# Altium PCB MiniPC.PcbDoc (part 12 of 24)
Units mm, origin at the board's own origin, x right, y up, seen from the top; angles counter-clockwise.
Board outline 175 x 155 mm, 16 copper layers (1_Top, 2_int1_(gnd), 3_int2_(power), 4_int3_(gnd), 5_int4_(sign), 6_int5_(power), 7_int6_(sign), 8_int7_(power), 9_int8_(gnd), 10_int9_(sign), 11_int10_(gnd), 12_int11_(sign), 13_int12_(gnd), 14_int13_(power), 15_int14_(gnd), 16_Bottom), stack 2.008 mm thick; 1046 components, 837 nets, 6010 pads, 4009 vias.
Unrouted connection lines stored in the file: 564.
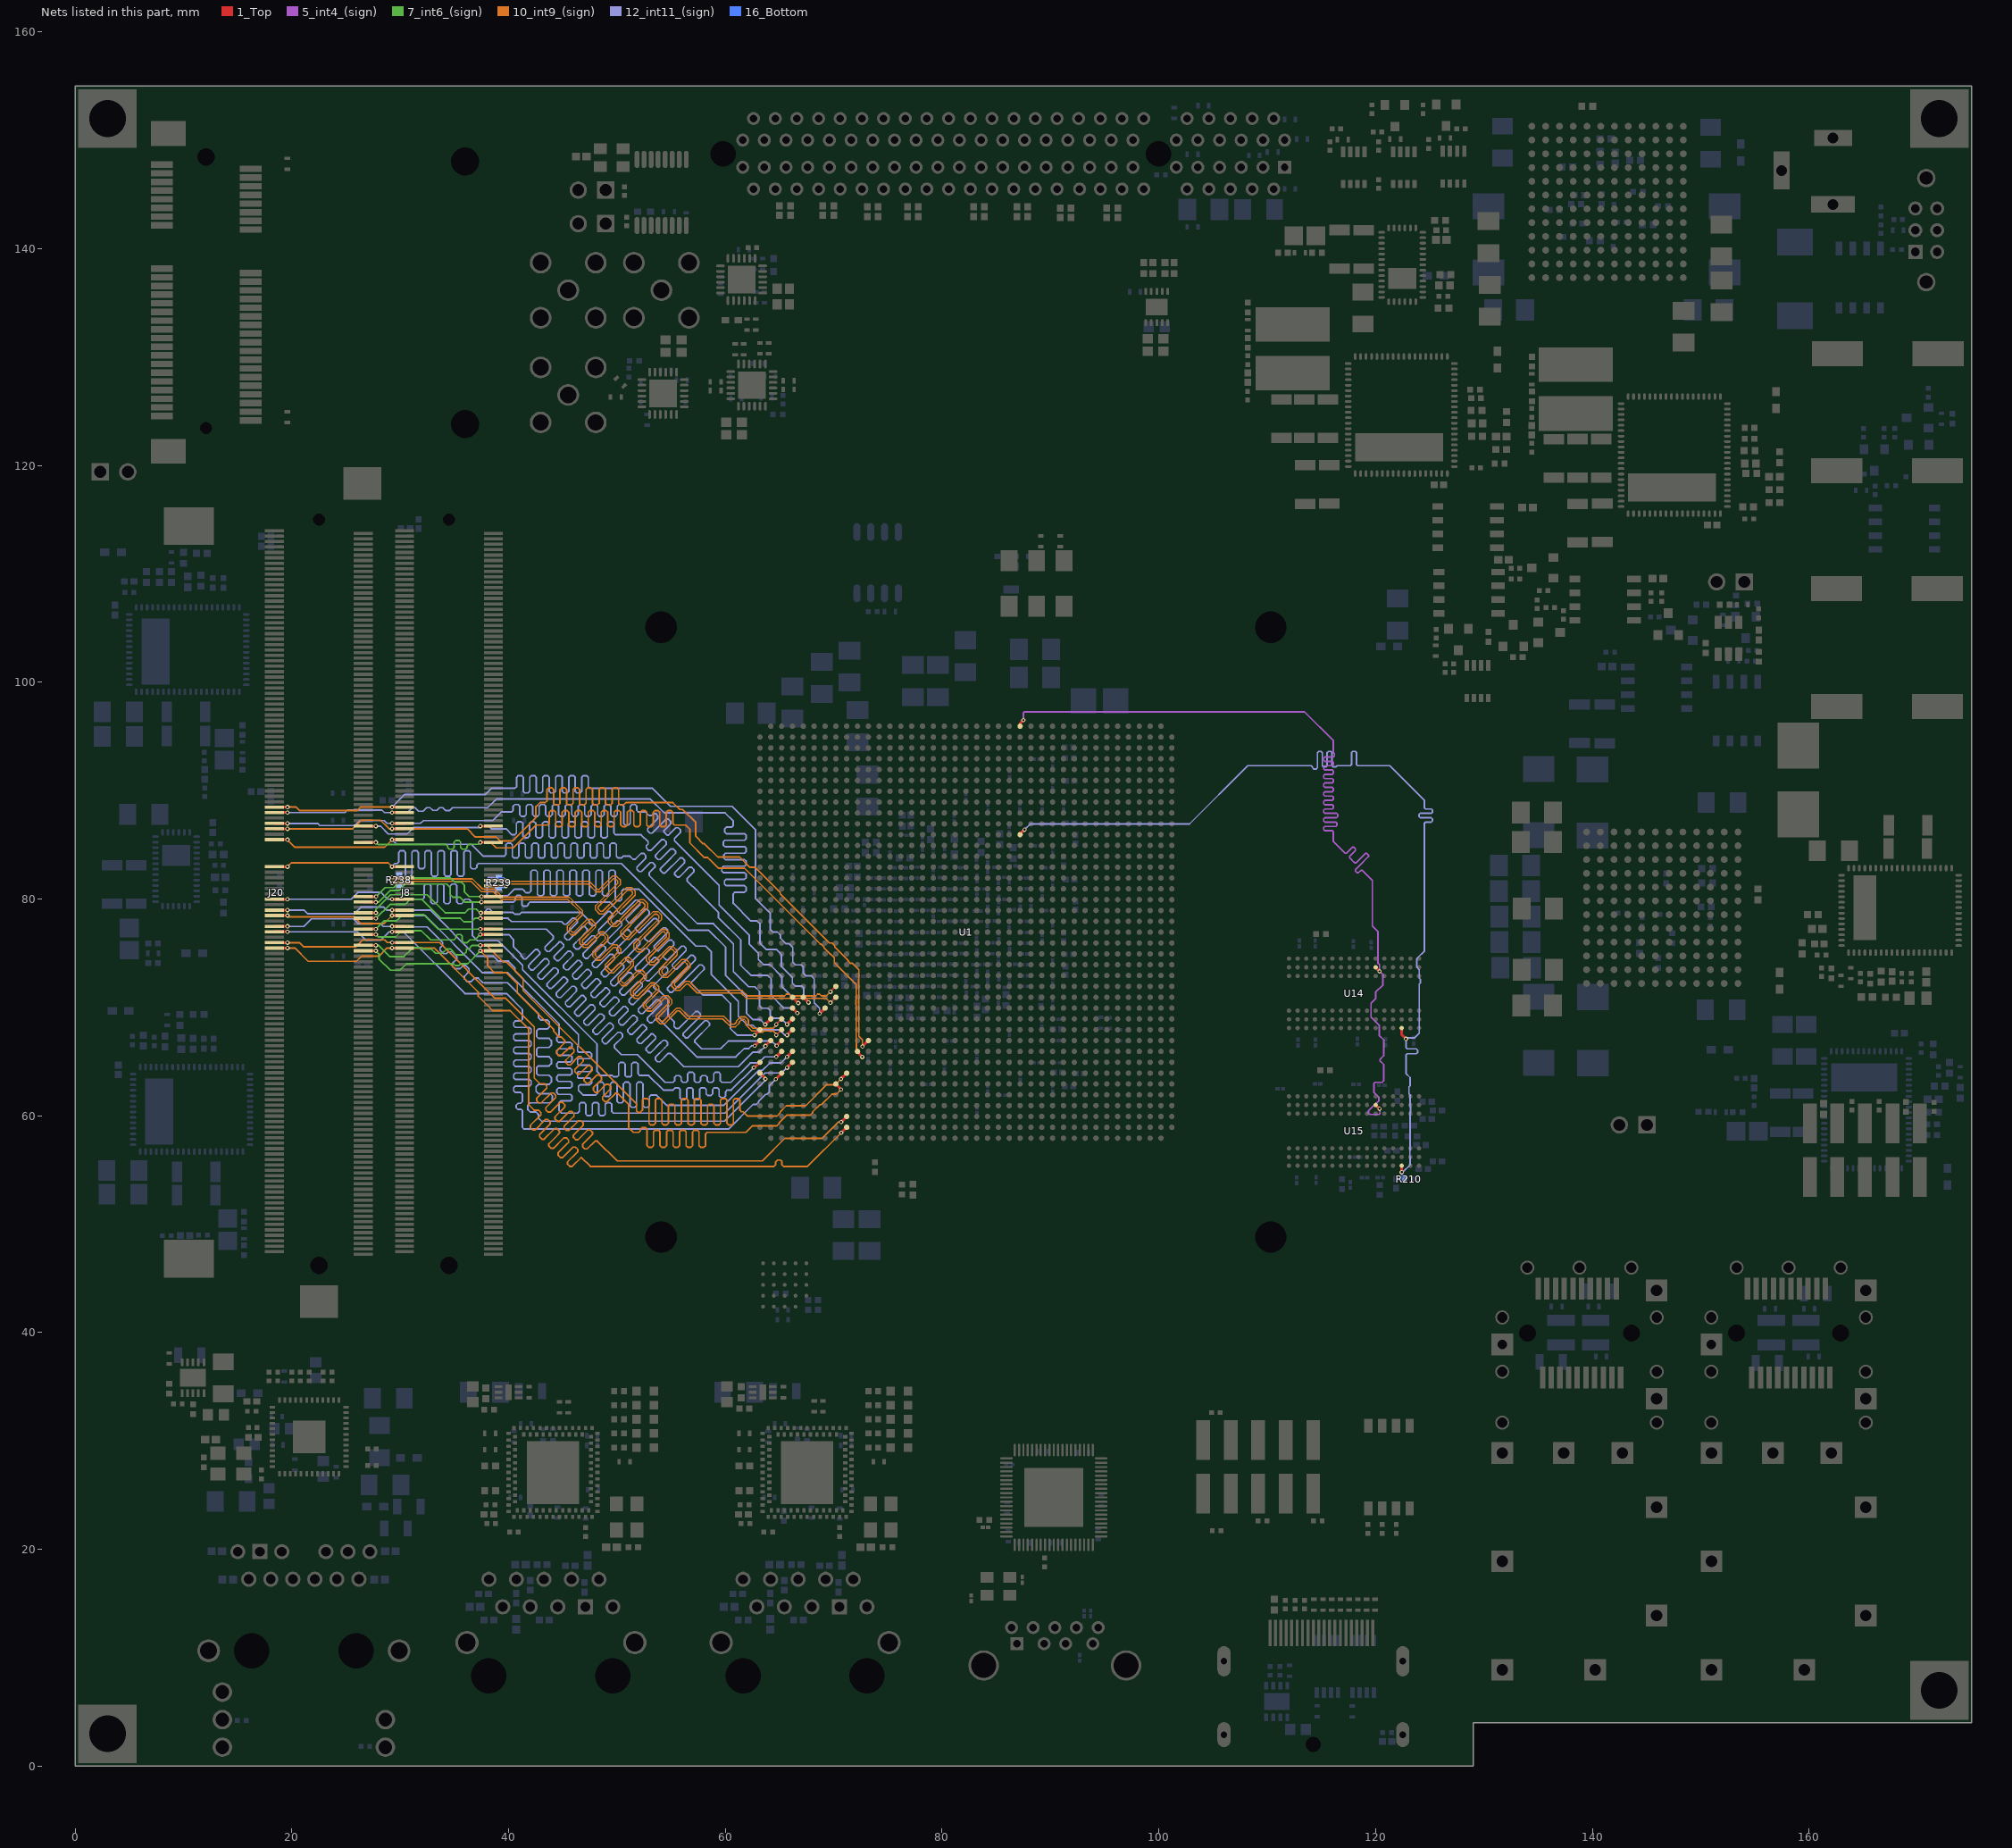
[diagram p24: the nets of this part, all layers, seen from the top]

## Via types
v1: diameter 0.4, hole 0.2, 1_Top to 16_Bottom, tented both sides, 1658 vias
v2: diameter 0.5, hole 0.2, 1_Top to 16_Bottom, tented both sides, 1014 vias
v3: diameter 0.7, hole 0.3, 1_Top to 16_Bottom, tented both sides, 915 vias
v4: diameter 0.6, hole 0.2, 1_Top to 16_Bottom, tented both sides, 278 vias
v5: diameter 0.4, hole 0.2, 1_Top to 16_Bottom, 93 vias
v6: diameter 0.4/0/0/0/0/0/0/0/0/0/0/0/0/0/0/0.4 (per signal layer), hole 0.2, 1_Top to 16_Bottom, tented both sides, 18 vias
v7: diameter 0.4/0/0/0/0/0/0/0/0/0/0/0.4/0.4/0.4/0.4/0.4 (per signal layer), hole 0.2, 1_Top to 16_Bottom, tented both sides, 16 vias
v8: diameter 0.5, hole 0.254, 1_Top to 16_Bottom, tented both sides, 15 vias
v9: diameter 0.5, hole 0.2, 1_Top to 16_Bottom, 2 vias

## Nets (pads, with @x,y where several pads share a name; then routed paths per layer and width w, separated by ;. In a path a pad name is that pad's centre, name@x,y a point inside that pad or via, vN(x,y) a via of type N, cw(c..) or ccw(c..) an arc to the next point about the centre after c; other vN are vias at no path point) (continued)
DDR4_RAS: U1.A25 U14.L8 U15.L8 | length 93.3
  1_Top w0.25: U1.A25@87.194,95.939 87.194,96.194 v1(87.5,96.5) ; U15.L8@120,61 v1(120.35,60.65) ; U14.L8@120,73.7 120.35,73.35 v1(120.35,73.328)
  5_int4_(sign) w0.15: v1(87.5,96.5) 87.5,97.179 87.581,97.26 113.44,97.26 116.1,94.6 116.1,93.811 116.1,93.7 116.1,93.5 116.192,93.408 116.192,93.192 116.1,93.1 115.31,93.1 115.21,93 115.21,92.8 115.31,92.7 116,92.7 116.1,92.6 116.1,92.4 116,92.3 115.31,92.3 115.21,92.2 115.21,92 115.31,91.9 116,91.9 116.1,91.8 116.1,91.6 116,91.5 115.31,91.5 115.21,91.4 115.21,91.2 115.31,91.1 116,91.1 116.1,91 116.1,90.8 116,90.7 115.31,90.7 115.21,90.6 115.21,90.4 115.31,90.3 116,90.3 116.1,90.2 116.1,90 116,89.9 115.31,89.9 115.21,89.8 115.21,89.6 115.31,89.5 116,89.5 116.1,89.4 116.1,89.2 116,89.1 115.31,89.1 115.21,89 115.21,88.8 115.31,88.7 116,88.7 116.1,88.6 116.1,88.4 116,88.3 115.31,88.3 115.21,88.2 115.21,88 115.31,87.9 116.1,87.9 116.4,87.9 116.5,87.8 116.5,87.6 116.4,87.5 116.1,87.5 115.31,87.5 115.21,87.4 115.21,87.2 115.31,87.1 116.1,87.1 116.327,87.1 116.427,87 116.427,86.8 116.327,86.7 116.1,86.7 115.31,86.7 115.21,86.6 115.21,86.4 115.31,86.3 116,86.3 116.1,86.2 116.1,86.1 116.1,85.3 117.1,84.3 117.171,84.229 117.312,84.229 117.853,84.77 117.994,84.77 118.136,84.629 118.136,84.487 117.595,83.946 117.595,83.805 117.7,83.7 117.988,83.413 118.058,83.342 118.2,83.342 119.054,84.196 119.195,84.196 119.337,84.054 119.337,83.913 118.412,82.988 118.137,82.713 118.137,82.572 118.278,82.431 118.42,82.431 118.652,82.663 118.737,82.663 119.7,81.7 119.7,77.5 120.2,77 120.2,74.1 120.35,73.95 v1(120.35,73.328) 120.371,73.328 120.67,73.029 120.67,72.07 120,71.4 120,70.801 119.824,70.625 119.575,70.376 119.575,69.104 120.325,68.354 120.325,67.424 120.745,67.004 120.745,65.545 120.4,65.2 120.4,65.067 120.745,64.722 120.745,63.245 120.591,63.091 119.939,63.091 119.83,62.983 119.83,62.169 120.3,61.699 120.3,61.4 119.34,60.44 119.34,60.26 119.475,60.125 120.325,60.125 120.4,60.2 120.4,60.6 v1(120.35,60.65) 120.372,60.65 v1@120.4,60.679
DDR4_RESETN: R210.1 U1.L25 U14.P1 U15.P1 | length 93.4
  1_Top w0.25: U1.L25@87.194,85.939 87.194,85.994 v1(87.6,86.4) ; v1(122.4,54.8) U15.P1@122.4,55.4 ; U14.P1@122.4,68.1 122.4,67.5 v1(122.8,67.1)
  12_int11_(sign) w0.15: v1(87.6,86.4) 88.125,86.925 102.825,86.925 108.2,92.3 113.5,92.3 113.725,92.3 114.062,92.3 114.175,92.188 114.175,92.112 114.287,92 114.512,92 114.625,92.112 114.625,92.3 114.625,93.506 114.737,93.619 114.962,93.619 115.075,93.506 115.075,92.3 115.185,92.19 115.415,92.19 115.525,92.3 115.525,93.506 115.637,93.619 115.862,93.619 115.975,93.506 115.975,92.3 116.085,92.19 116.315,92.19 116.425,92.3 116.875,92.3 117.1,92.3 117.325,92.3 117.662,92.3 117.775,92.412 117.775,93.506 117.887,93.619 118.112,93.619 118.225,93.506 118.225,92.412 118.337,92.3 118.5,92.3 121.3,92.3 124.5,89.1 124.5,88.5 124.5,88.4 124.6,88.3 125.135,88.3 125.235,88.2 125.235,88 125.135,87.9 124.5,87.9 124.1,87.9 124,87.8 124,87.6 124.1,87.5 124.5,87.5 125.135,87.5 125.235,87.4 125.235,87.2 125.135,87.1 124.6,87.1 124.5,87 124.5,86.275 124.5,75.199 123.876,74.575 123.8,74.499 123.8,73.701 124.025,73.476 124.025,72.698 124.125,72.598 124.125,72.246 124.025,72.147 124.025,69.8 124.025,67.624 123.601,67.2 122.9,67.2 v1(122.8,67.1) 122.8,66.4 122.8,66.288 122.912,66.175 123.756,66.175 123.868,66.063 123.868,65.838 123.756,65.725 122.912,65.725 122.8,65.613 122.8,65.4 122.8,63.9 123.175,63.525 123.175,62.775 123.075,62.675 123.075,62.024 123.175,61.924 123.175,60.826 123.225,60.776 123.225,60.424 123.175,60.374 123.175,59.016 123.181,59.01 123.181,56.826 123.153,56.798 123.153,56.222 123.175,56.2 123.175,55.475 122.5,54.8 v1(122.4,54.8)
  16_Bottom w0.25: v1(122.4,54.8) 122.425,54.775 R210.1@122.425,54.175
DDR4_SODIMM_A0: J8.144 J20.144 U1.AH2 | length 79.6
  1_Top w0.25: J20.144@18.4,82.975 v1(19.602,82.975) ; v1(29.25,82.975) J8.144@30.4,82.975 ; v1(63.675,68.425) 63.68,68.425 U1.AH2@64.194,68.939
  10_int9_(sign) w0.15: v1(19.602,82.975) 19.977,83.35 28.875,83.35 v1(29.25,82.975)
  12_int11_(sign) w0.15: v1(29.25,82.975) 29.25,83.025 29.5,83.275 29.725,83.275 29.875,83.425 29.875,84.309 30.025,84.459 30.325,84.459 30.475,84.309 30.475,82.241 30.625,82.091 30.925,82.091 31.075,82.241 31.075,84.309 31.225,84.459 31.525,84.459 31.675,84.309 31.675,82.942 31.825,82.792 32.125,82.792 32.275,82.942 32.275,84.309 32.425,84.459 32.725,84.459 32.875,84.309 32.875,82.241 33.025,82.091 33.325,82.091 33.475,82.241 33.475,84.309 33.625,84.459 33.925,84.459 34.075,84.309 34.075,82.241 34.225,82.091 34.525,82.091 34.675,82.241 34.675,84.309 34.825,84.459 35.125,84.459 35.275,84.309 35.275,82.241 35.425,82.091 35.725,82.091 35.875,82.241 35.875,84.309 36.025,84.459 36.325,84.459 36.475,84.309 36.475,82.931 36.625,82.781 36.925,82.781 37.075,82.931 37.075,83.125 37.225,83.275 50.4,83.275 56.55,77.125 58.45,77.125 60.025,75.55 60.025,72.95 61.95,71.025 61.95,69.469 62.531,68.888 63.212,68.888 v1(63.675,68.425)
DDR4_SODIMM_A1: J8.133 J20.133 U1.AJ4 | length 85.5
  1_Top w0.25: J20.133@26.6,80.225 v1(27.775,80.225) ; v1(37.5,80.225) J8.133@38.6,80.225 ; v1(65.694,67.439) U1.AJ4@66.194,67.939
  7_int6_(sign) w0.15: v1(27.775,80.225) 28.6,81.05 29.4,81.05 30.275,81.925 34.65,81.925 35,81.575 35.6,81.575 35.925,81.25 35.925,80.65 36.35,80.225 v1(37.5,80.225)
  12_int11_(sign) w0.15: v1(37.5,80.225) 37.575,80.3 37.9,80.3 38.025,80.425 38.025,81.875 38.125,81.975 38.7,81.975 38.8,81.875 38.8,80.5 39,80.3 39.925,80.3 40.525,80.9 41.3,80.9 41.45,80.75 41.45,80.727 41.6,80.577 41.9,80.577 42.05,80.727 42.05,82.516 42.2,82.666 42.5,82.666 42.65,82.516 42.65,80.444 42.8,80.294 43.1,80.294 43.25,80.444 43.25,82.516 43.4,82.666 43.7,82.666 43.85,82.516 43.85,80.444 44,80.294 44.3,80.294 44.45,80.444 44.45,82.516 44.6,82.666 44.9,82.666 45.05,82.516 45.05,80.444 45.2,80.294 45.5,80.294 45.65,80.444 45.65,82.516 45.8,82.666 46.1,82.666 46.25,82.516 46.25,80.444 46.4,80.294 46.7,80.294 46.85,80.444 46.85,82.516 47,82.666 47.3,82.666 47.45,82.516 47.45,80.444 47.6,80.294 47.9,80.294 48.05,80.444 48.05,82.516 48.2,82.666 48.5,82.666 48.65,82.516 48.65,80.444 48.8,80.294 49.1,80.294 49.25,80.444 49.25,82.516 49.4,82.666 49.7,82.666 49.85,82.516 49.85,79.98 50,79.83 50.3,79.83 50.45,79.98 50.45,80.75 50.6,80.9 52.05,80.9 57.3,75.65 58.2,75.65 58.7,75.15 58.7,73.05 61.2,70.55 61.2,69.2 62.042,68.358 62.533,68.358 62.95,67.94 64.985,67.94 65.486,67.439 v1(65.694,67.439)
DDR4_SODIMM_A2: J8.132 J20.132 U1.AM1 | length 78.5
  1_Top w0.25: J20.132@18.4,79.975 v1(19.602,79.975) ; v1(29.25,79.975) J8.132@30.4,79.975 ; v1(62.625,64.45) 62.705,64.45 U1.AM1@63.194,64.939
  12_int11_(sign) w0.15: v1(19.602,79.975) 25.475,79.975 26.125,80.625 28.2,80.625 28.85,79.975 v1(29.25,79.975) 32.075,79.975 32.225,80.125 32.225,81.224 32.375,81.374 32.675,81.374 32.825,81.224 32.825,79.726 32.975,79.576 33.275,79.576 33.425,79.726 33.425,81.224 33.575,81.374 33.875,81.374 34.025,81.224 34.025,79.726 34.175,79.576 34.475,79.576 34.625,79.726 34.625,81.224 34.775,81.374 35.075,81.374 35.225,81.224 35.225,79.726 35.375,79.576 35.675,79.576 35.825,79.726 35.825,79.825 35.975,79.975 36.35,79.975 36.675,79.65 36.675,76.6 37.125,76.15 39.025,76.15 41.3,73.875 41.3,73.475 48.16,66.615 48.16,64.09 48.527,63.723 49.55,63.723 49.665,63.608 50.035,63.608 50.15,63.723 50.15,64.773 50.3,64.923 50.6,64.923 50.75,64.773 50.75,63.723 50.865,63.608 51.235,63.608 51.35,63.723 51.35,64.773 51.5,64.923 51.8,64.923 51.95,64.773 51.95,63.873 52.1,63.723 52.923,63.723 54.271,62.375 55.17,62.375 55.375,62.58 55.675,62.58 55.825,62.43 55.825,61.635 55.975,61.485 56.275,61.485 56.425,61.635 56.425,62.43 56.575,62.58 56.875,62.58 57.025,62.43 57.025,61.635 57.175,61.485 57.475,61.485 57.625,61.635 57.625,62.43 57.775,62.58 58.075,62.58 58.225,62.43 58.225,62.034 58.375,61.884 58.675,61.884 58.825,62.034 58.825,62.43 58.975,62.58 59.275,62.58 59.425,62.43 59.425,61.846 59.575,61.696 59.875,61.696 60.025,61.846 60.025,62.225 60.175,62.375 60.55,62.375 v1(62.625,64.45)
DDR4_SODIMM_A3: J8.131 J20.131 U1.AJ1 | length 80.8
  1_Top w0.25: J20.131@26.6,79.725 27.73,79.725 v1(27.751,79.704) ; v1(37.5,79.725) 38.592,79.725 38.596,79.729 J8.131@38.6,79.725 ; v1(62.694,67.439) U1.AJ1@63.194,67.939
  7_int6_(sign) w0.15: v1(27.751,79.704) 28.004,79.704 29.075,80.775 29.875,80.775 30.475,81.375 34.3,81.375 34.625,81.05 34.625,80.4 34.85,80.175 35.5,80.175 35.95,79.725 v1(37.5,79.725)
  12_int11_(sign) w0.15: v1(37.5,79.725) 40.475,79.725 40.625,79.875 40.625,80.172 40.775,80.322 41.075,80.322 41.225,80.172 41.225,79.483 41.375,79.333 41.675,79.333 41.825,79.483 41.825,79.575 41.975,79.725 49.325,79.725 50.011,79.039 50.011,78.915 50.312,78.614 50.436,78.614 51.714,79.893 51.926,79.893 52.138,79.681 52.138,79.468 50.86,78.19 50.86,78.067 51.161,77.766 51.284,77.766 52.563,79.044 52.775,79.044 52.987,78.832 52.987,78.62 51.708,77.342 51.708,77.218 52.009,76.917 52.133,76.917 53.411,78.196 53.623,78.196 53.835,77.984 53.835,77.771 52.557,76.493 52.557,76.37 52.858,76.069 52.981,76.069 54.26,77.347 54.472,77.347 54.684,77.135 54.684,76.923 53.405,75.644 53.405,75.521 53.706,75.22 53.83,75.22 54.823,76.214 55.035,76.214 55.247,76.002 55.247,75.789 54.254,74.796 54.254,74.673 54.555,74.372 54.678,74.372 55.957,75.65 56.169,75.65 56.381,75.438 56.381,75.226 55.103,73.947 55.103,73.824 55.404,73.523 55.527,73.523 56.805,74.802 57.017,74.802 57.229,74.589 57.229,74.377 54.673,71.821 54.673,71.608 54.885,71.396 55.097,71.396 56.375,72.675 57.621,73.921 57.833,73.921 58.046,73.709 58.046,73.496 56.825,72.276 56.825,72.225 57.9,71.15 59.675,71.15 60.475,70.35 60.475,68.05 61.086,67.439 v1(62.694,67.439)
DDR4_SODIMM_A4: J8.128 J20.128 U1.AL4 | length 83.1
  1_Top w0.25: J20.128@18.4,78.975 v1(19.602,78.975) ; v1(29.25,78.975) J8.128@30.4,78.975 ; v1(65.694,65.439) U1.AL4@66.194,65.939
  12_int11_(sign) w0.15: v1(19.602,78.975) 21.125,78.975 21.45,78.65 25.775,78.65 26.375,79.25 28.475,79.25 28.75,78.975 v1(29.25,78.975) 32.775,78.975 37.025,74.725 38.6,74.725 39.062,74.263 39.987,74.263 40.6,73.65 40.6,73.35 46.45,67.5 46.45,66.475 46.365,66.39 46.365,65.96 46.45,65.875 47.5,65.875 47.65,65.725 47.65,65.425 47.5,65.275 46.45,65.275 46.365,65.19 46.365,64.76 46.45,64.675 47.5,64.675 47.65,64.525 47.65,64.225 47.5,64.075 46.45,64.075 46.365,63.99 46.365,63.56 46.45,63.475 47.5,63.475 47.65,63.325 47.65,63.025 47.5,62.875 46.6,62.875 46.45,62.725 46.45,62.35 46.875,61.925 48.05,61.925 48.2,62.075 48.2,62.948 48.35,63.098 48.65,63.098 48.8,62.948 48.8,61.925 48.931,61.794 49.269,61.794 49.4,61.925 49.4,62.948 49.55,63.098 49.85,63.098 50,62.948 50,61.346 50.15,61.196 50.45,61.196 50.6,61.346 50.6,62.948 50.75,63.098 51.05,63.098 51.2,62.948 51.2,60.931 51.35,60.781 51.65,60.781 51.8,60.931 51.8,62.948 51.95,63.098 52.25,63.098 52.4,62.948 52.4,60.931 52.55,60.781 52.85,60.781 53,60.931 53,61.775 53.15,61.925 53.625,61.925 54.575,60.975 59.875,60.975 63.1,64.2 63.425,64.2 64.1,64.875 65.13,64.875 v1(65.694,65.439)
DDR4_SODIMM_A5: J8.126 J20.126 U1.AM4 | length 81.5
  1_Top w0.25: J20.126@18.4,78.475 v1(19.602,78.475) ; v1(29.25,78.475) J8.126@30.4,78.475 ; v1(65.694,64.439) U1.AM4@66.194,64.939
  10_int9_(sign) w0.15: v1(19.602,78.475) 19.727,78.35 25.775,78.35 26.4,77.725 28.5,77.725 v1(29.25,78.475)
  12_int11_(sign) w0.15: v1(29.25,78.475) 32.3,78.475 37.575,73.2 39.925,73.2 44.655,68.47 44.655,67.42 44.46,67.225 44.46,66.925 44.61,66.775 45.705,66.775 45.855,66.625 45.855,66.325 45.705,66.175 44.61,66.175 44.46,66.025 44.46,65.725 44.61,65.575 45.705,65.575 45.855,65.425 45.855,65.125 45.705,64.975 44.61,64.975 44.46,64.825 44.46,64.525 44.61,64.375 45.705,64.375 45.855,64.225 45.855,63.925 45.705,63.775 44.61,63.775 44.46,63.625 44.46,63.325 44.61,63.175 45.705,63.175 45.855,63.025 45.855,62.725 45.705,62.575 44.61,62.575 44.46,62.425 44.46,62.125 44.61,61.975 45.705,61.975 45.855,61.825 45.855,61.525 45.705,61.375 44.805,61.375 44.655,61.225 44.655,60.475 44.886,60.245 46.375,60.245 46.525,60.395 46.525,61.073 46.675,61.223 46.975,61.223 47.125,61.073 47.125,60.162 47.275,60.012 47.575,60.012 47.725,60.162 47.725,61.073 47.875,61.223 48.175,61.223 48.325,61.073 48.325,60.162 48.475,60.012 48.775,60.012 48.925,60.162 48.925,61.057 49.075,61.207 49.375,61.207 49.525,61.057 49.525,60.395 49.675,60.245 59.945,60.245 63.65,63.95 65.205,63.95 v1(65.694,64.439)
DDR4_SODIMM_A6: J8.127 J20.127 U1.AK3 | length 85.4
  1_Top w0.25: J20.127@26.6,78.725 v1(27.75,78.725) ; v1(37.436,78.725) J8.127@38.6,78.725 ; v1(64.725,66.47) U1.AK3@65.194,66.939
  7_int6_(sign) w0.15: v1(27.75,78.725) 27.75,79.05 29.1,80.4 32.479,80.4 34.154,78.725 35.975,78.725 36.325,79.075 37,79.075 37.35,78.725 v1(37.436,78.725)
  12_int11_(sign) w0.15: v1(37.436,78.725) 37.7,78.725 38.05,79.075 38.25,79.075 38.571,78.754 40.4,78.754 40.554,78.6 41.021,78.6 41.175,78.754 46.695,78.754 47.45,77.999 47.45,77.766 47.663,77.553 47.875,77.553 49.164,78.843 49.376,78.843 49.588,78.631 49.588,78.418 48.31,77.14 48.299,77.129 48.299,76.917 48.511,76.705 48.723,76.705 48.734,76.716 50.013,77.994 50.225,77.994 50.437,77.782 50.437,77.57 49.148,76.281 49.148,76.069 49.36,75.856 49.572,75.856 50.861,77.146 51.073,77.146 51.285,76.934 51.285,76.721 50.007,75.443 49.996,75.432 49.996,75.22 50.208,75.008 50.42,75.008 50.431,75.019 51.71,76.297 51.922,76.297 52.134,76.085 52.134,75.873 50.845,74.584 50.845,74.371 51.057,74.159 51.269,74.159 52.558,75.449 52.77,75.449 52.982,75.237 52.982,75.024 51.693,73.735 51.693,73.523 51.905,73.311 52.117,73.311 52.128,73.322 53.407,74.6 53.619,74.6 53.831,74.388 53.831,74.176 52.553,72.897 52.542,72.887 52.542,72.674 52.754,72.462 52.966,72.462 54.255,73.752 54.467,73.752 54.679,73.539 54.679,73.327 53.39,72.038 53.39,71.826 53.602,71.614 53.814,71.614 53.836,71.614 54.7,70.75 54.7,69.275 55.28,68.695 55.28,68.483 55.266,68.468 55.266,68.256 55.478,68.044 55.69,68.044 57.264,69.618 57.476,69.618 57.688,69.406 57.688,69.193 56.235,67.74 56.115,67.62 56.115,67.408 56.327,67.195 56.539,67.195 56.659,67.316 58.113,68.769 58.325,68.769 58.537,68.557 58.537,68.345 57.19,66.998 57.19,66.785 57.8,66.175 59.55,66.175 60.27,66.895 64.3,66.895 v1(64.725,66.47)
DDR4_SODIMM_A7: J8.122 J20.122 U1.AN1 | length 78.8
  1_Top w0.25: J20.122@18.4,77.475 v1(19.602,77.475) ; v1(29.25,77.475) J8.122@30.4,77.475 ; U1.AN1@63.194,63.939 63.7,63.433 v1(63.7,63.4)
  12_int11_(sign) w0.15: v1(19.602,77.475) 21.1,77.475 21.8,78.175 25.675,78.175 26.125,77.725 28.2,77.725 28.45,77.475 v1(29.25,77.475) 29.3,77.425 32.475,77.425 33.925,75.975 33.925,75.725 33.675,75.475 33.675,75.275 34,74.95 34.25,74.95 34.412,75.112 34.788,75.112 35.225,74.675 35.225,74.475 34.825,74.075 34.825,73.775 35.025,73.575 35.525,73.575 35.8,73.85 36.05,73.85 36.35,73.55 36.35,73.3 35.925,72.875 35.925,72.625 36.175,72.375 36.525,72.375 36.85,72.7 37.2,72.7 37.625,72.275 39.9,72.275 42.75,69.425 42.75,69.063 42.963,68.85 43.554,68.85 43.766,68.637 43.766,68.213 43.554,68 42.75,68 42.585,67.835 42.585,67.315 42.75,67.15 43.737,67.15 43.95,66.937 43.95,66.512 43.737,66.3 42.75,66.3 42.585,66.135 42.585,65.615 42.75,65.45 43.737,65.45 43.95,65.237 43.95,64.812 43.737,64.6 42.75,64.6 42.585,64.435 42.585,63.915 42.75,63.75 43.737,63.75 43.95,63.537 43.95,63.112 43.737,62.9 42.75,62.9 42.539,62.689 42.539,62.261 42.75,62.05 43.826,62.05 44.039,61.837 44.039,61.412 43.826,61.2 41.994,61.2 41.781,60.987 41.781,60.562 41.994,60.35 42.537,60.35 42.75,60.137 42.75,59.8 43.048,59.502 59.923,59.502 63.7,63.279 v1(63.7,63.4)
DDR4_SODIMM_A8: J8.125 J20.125 U1.AK1 | length 82.4
  1_Top w0.25: J20.125@26.6,78.225 27.73,78.225 v1(27.751,78.204) ; v1(37.398,78.225) J8.125@38.6,78.225 ; v1(62.725,66.47) U1.AK1@63.194,66.939
  7_int6_(sign) w0.15: v1(27.751,78.204) 27.759,78.204 29.055,79.5 30.45,79.5 30.925,79.975 32,79.975 33.75,78.225 35.55,78.225 35.875,77.9 36.575,77.9 36.9,78.225 v1(37.398,78.225)
  12_int11_(sign) w0.15: v1(37.398,78.225) 39.95,78.225 40.25,77.925 44.876,77.925 45.131,77.67 45.343,77.67 45.912,78.238 46.124,78.238 46.336,78.026 46.336,77.814 45.172,76.651 45.172,76.439 45.385,76.226 45.597,76.226 46.82,77.45 47.033,77.45 47.245,77.238 47.245,77.026 46.51,76.291 46.021,75.802 46.021,75.59 46.233,75.378 46.445,75.378 46.934,75.867 47.669,76.602 47.881,76.602 48.093,76.39 48.093,76.177 47.358,75.443 46.87,74.954 46.87,74.742 47.082,74.529 47.294,74.529 48.518,75.753 48.73,75.753 48.942,75.541 48.942,75.329 48.207,74.594 47.718,74.105 47.718,73.893 47.93,73.681 48.142,73.681 48.631,74.17 49.366,74.905 49.578,74.905 49.79,74.692 49.79,74.48 49.056,73.746 48.567,73.257 48.567,73.045 48.779,72.832 48.991,72.832 50.215,74.056 50.427,74.056 50.639,73.844 50.639,73.632 49.904,72.897 49.415,72.408 49.415,72.196 49.627,71.984 49.839,71.984 50.328,72.473 51.063,73.208 51.275,73.208 51.487,72.995 51.487,72.783 50.753,72.048 50.264,71.56 50.264,71.347 50.476,71.135 50.688,71.135 51.177,71.624 51.912,72.359 52.124,72.359 52.336,72.147 52.336,71.935 51.601,71.2 51.112,70.711 51.112,70.499 51.324,70.287 51.536,70.287 52.025,70.776 52.76,71.51 52.972,71.51 53.184,71.298 53.184,71.086 52.45,70.351 51.961,69.863 51.961,69.65 52.173,69.438 52.385,69.438 52.874,69.927 53.658,70.711 53.87,70.711 54.082,70.499 54.082,70.287 53.298,69.503 52.809,69.014 52.809,68.802 53.021,68.59 53.233,68.59 53.616,68.973 53.828,68.973 55.825,66.976 ; 55.825,66.975 57.375,65.425 60.964,65.425 61.75,66.211 62.164,66.211 62.424,66.47 v1(62.725,66.47)
DDR4_SODIMM_A9: J8.121 J20.121 U1.AK2 | length 81.8
  1_Top w0.25: J20.121@26.6,77.225 v1(27.75,77.225) ; v1(37.398,77.225) J8.121@38.6,77.225 ; v1(63.694,66.439) U1.AK2@64.194,66.939
  7_int6_(sign) w0.15: v1(27.75,77.225) 28.5,77.975 29.625,77.975 30.2,78.55 32.2,78.55 33.525,77.225 v1(37.398,77.225)
  12_int11_(sign) w0.15: v1(37.398,77.225) 43.475,77.225 44.13,76.57 44.13,76.358 43.361,75.589 43.361,75.376 43.574,75.164 43.786,75.164 44.661,76.039 44.838,76.039 45.085,75.793 45.085,75.615 44.21,74.74 44.21,74.528 44.422,74.316 44.634,74.316 45.509,75.191 45.687,75.191 45.933,74.944 45.933,74.767 45.058,73.892 45.058,73.679 45.271,73.467 45.483,73.467 46.358,74.342 46.535,74.342 46.782,74.096 46.782,73.918 45.907,73.043 45.907,72.831 46.119,72.619 46.331,72.619 47.206,73.494 47.384,73.494 47.631,73.247 47.631,73.07 46.755,72.194 46.755,71.982 46.968,71.77 47.18,71.77 48.055,72.645 48.233,72.645 48.479,72.399 48.479,72.221 47.604,71.346 47.604,71.134 47.816,70.922 48.028,70.922 48.903,71.797 49.081,71.797 49.328,71.55 49.328,71.372 48.453,70.497 48.453,70.285 48.665,70.073 48.877,70.073 49.752,70.948 49.93,70.948 50.176,70.702 50.176,70.524 49.301,69.649 49.301,69.437 49.513,69.225 49.725,69.225 50.6,70.1 50.778,70.1 51.025,69.853 51.025,69.675 50.15,68.8 50.15,68.588 50.362,68.376 50.574,68.376 51.449,69.251 51.627,69.251 51.873,69.005 51.873,68.827 50.998,67.952 50.998,67.74 51.21,67.528 51.422,67.528 52.297,68.403 52.475,68.403 52.722,68.156 52.722,67.978 51.846,67.102 51.846,66.89 52.058,66.678 52.27,66.678 53.146,67.554 53.324,67.554 53.57,67.308 53.57,67.13 52.694,66.254 52.694,66.042 52.906,65.83 53.119,65.83 53.994,66.706 54.252,66.963 54.464,66.963 54.677,66.751 54.677,66.539 54.419,66.281 53.543,65.405 53.543,65.193 53.755,64.981 53.967,64.981 54.737,65.751 54.949,65.751 56.162,64.538 56.525,64.538 61.213,64.538 62.55,65.875 63.13,65.875 v1(63.694,66.439)
DDR4_SODIMM_A10: J8.146 J20.146 U1.AH4 | length 85
  1_Top w0.25: J20.146@18.4,85.475 v1(19.602,85.475) ; v1(29.25,85.475) J8.146@30.4,85.475 ; v1(65.694,68.439) U1.AH4@66.194,68.939
  10_int9_(sign) w0.15: v1(19.602,85.475) 20.302,84.775 28.55,84.775 v1(29.25,85.475)
  12_int11_(sign) w0.15: v1(29.25,85.475) 29.675,85.05 36.575,85.05 37.675,83.95 39.6,83.95 39.75,84.1 39.75,85 39.9,85.15 40.2,85.15 40.35,85 40.35,83.935 40.5,83.785 40.8,83.785 40.95,83.935 40.95,85 41.1,85.15 41.4,85.15 41.55,85 41.55,83.935 41.7,83.785 42,83.785 42.15,83.935 42.15,85 42.3,85.15 42.6,85.15 42.75,85 42.75,83.935 42.9,83.785 43.2,83.785 43.35,83.935 43.35,85 43.5,85.15 43.8,85.15 43.95,85 43.95,83.935 44.1,83.785 44.4,83.785 44.55,83.935 44.55,85 44.7,85.15 45,85.15 45.15,85 45.15,83.935 45.3,83.785 45.6,83.785 45.75,83.935 45.75,85 45.9,85.15 46.2,85.15 46.35,85 46.35,83.935 46.5,83.785 46.8,83.785 46.95,83.935 46.95,85 47.1,85.15 47.4,85.15 47.55,85 47.55,83.935 47.7,83.785 48,83.785 48.15,83.935 48.15,85 48.3,85.15 48.6,85.15 48.75,85 48.75,83.935 48.9,83.785 49.2,83.785 49.35,83.935 49.35,85 49.5,85.15 49.8,85.15 49.95,85 49.95,83.935 50.1,83.785 50.4,83.785 50.565,83.95 51.2,83.95 51.481,83.669 51.693,83.669 52.233,84.209 52.445,84.209 52.657,83.997 52.657,83.785 51.837,82.964 51.837,82.752 52.049,82.54 52.261,82.54 53.082,83.36 53.294,83.36 53.506,83.148 53.506,82.936 52.966,82.396 52.966,82.184 57.425,77.725 58.9,77.725 60.75,75.875 60.75,73.3 62.15,71.9 62.725,71.9 63.15,71.475 63.15,70.125 63.35,69.925 63.925,69.925 64.15,69.7 64.15,69.25 64.392,69.008 65.125,69.008 v1(65.694,68.439)
DDR4_SODIMM_A11: J8.120 J20.120 U1.AN3 | length 81.3
  1_Top w0.25: J20.120@18.4,76.975 v1(19.602,76.975) ; v1(29.25,76.975) J8.120@30.4,76.975 ; v1(64.653,63.378) 64.653,63.392 64.65,63.395 U1.AN3@65.194,63.939
  12_int11_(sign) w0.15: v1(19.602,76.975) 26.075,76.975 26.85,76.2 28.2,76.2 28.975,76.975 v1(29.25,76.975) 30.275,76.975 35.975,71.275 39.8,71.275 41.275,69.8 41.275,68.9 41.125,68.75 40.625,68.75 40.475,68.6 40.475,68.3 40.625,68.15 41.925,68.15 42.075,68 42.075,67.7 41.925,67.55 40.625,67.55 40.475,67.4 40.475,67.1 40.625,66.95 41.925,66.95 42.075,66.8 42.075,66.5 41.925,66.35 40.625,66.35 40.475,66.2 40.475,65.9 40.625,65.75 41.925,65.75 42.075,65.6 42.075,65.3 41.925,65.15 40.625,65.15 40.475,65 40.475,64.7 40.625,64.55 41.925,64.55 42.075,64.4 42.075,64.1 41.925,63.95 40.625,63.95 40.475,63.8 40.475,63.5 40.625,63.35 41.925,63.35 42.075,63.2 42.075,62.9 41.925,62.75 40.625,62.75 40.475,62.6 40.475,62.3 40.625,62.15 41.125,62.15 41.275,62 41.275,61.325 41.1,61.15 40.875,61.15 40.7,60.975 40.7,60.75 40.85,60.6 41.175,60.6 41.275,60.5 41.275,58.925 41.425,58.775 60.296,58.775 62.571,61.05 62.855,61.05 63.075,61.27 63.075,61.355 63.698,61.978 63.833,61.978 64.053,62.198 64.053,62.778 v1(64.653,63.378)
DDR4_SODIMM_A12: J8.119 J20.119 U1.AL3 | length 84.7
  1_Top w0.25: J20.119@26.6,76.725 v1(27.75,76.725) ; v1(37.398,76.725) J8.119@38.6,76.725 ; v1(64.7,65.445) U1.AL3@65.194,65.939
  7_int6_(sign) w0.15: v1(27.75,76.725) 27.975,76.5 29.575,76.5 30.15,77.075 31.95,77.075 32.8,76.225 34.975,76.225 35.125,76.375 35.125,76.576 35.275,76.726 35.575,76.726 35.725,76.576 35.725,76.125 35.875,75.975 36.175,75.975 36.425,76.225 36.898,76.225 v1(37.398,76.725)
  12_int11_(sign) w0.15: v1(37.398,76.725) 37.408,76.715 40.01,76.715 40.45,76.275 40.45,75.6 41.161,74.889 41.161,74.735 41.432,74.464 41.586,74.464 42.456,75.334 42.668,75.334 42.88,75.122 42.88,74.91 42.01,74.04 41.852,73.883 41.852,73.671 42.065,73.458 42.277,73.458 42.434,73.616 43.304,74.486 43.516,74.486 43.728,74.274 43.728,74.061 42.858,73.192 42.701,73.034 42.701,72.822 42.913,72.61 43.125,72.61 44.153,73.637 44.365,73.637 44.577,73.425 44.577,73.213 43.707,72.343 43.55,72.186 43.55,71.973 43.762,71.761 43.974,71.761 44.131,71.919 45.001,72.789 45.213,72.789 45.425,72.577 45.425,72.364 44.555,71.495 44.398,71.337 44.398,71.125 44.61,70.913 44.822,70.913 45.85,71.94 46.062,71.94 46.274,71.728 46.274,71.516 45.404,70.646 45.247,70.489 45.247,70.276 45.459,70.064 45.671,70.064 45.828,70.222 46.698,71.092 46.91,71.092 47.122,70.88 47.122,70.667 46.253,69.797 46.095,69.64 46.095,69.428 46.307,69.216 46.519,69.216 47.547,70.243 47.759,70.243 47.971,70.031 47.971,69.819 46.944,68.791 46.944,68.579 47.156,68.367 47.368,68.367 47.525,68.525 48.395,69.395 48.607,69.395 48.82,69.182 48.82,68.97 47.95,68.1 47.792,67.943 47.792,67.731 48.004,67.519 48.216,67.519 49.244,68.546 49.456,68.546 49.668,68.334 49.668,68.122 48.625,67.078 48.625,66.866 48.837,66.654 49.049,66.654 49.222,66.828 50.092,67.698 50.304,67.698 50.517,67.485 50.517,67.273 49.753,66.509 49.753,66.297 50.4,65.65 51.875,65.65 54.435,63.09 55.175,63.09 55.325,63.24 55.325,63.551 55.475,63.701 55.775,63.701 55.925,63.551 55.925,63.24 56.075,63.09 56.375,63.09 56.525,63.24 56.525,63.878 56.675,64.028 56.975,64.028 57.125,63.878 57.125,63.24 57.275,63.09 57.575,63.09 57.725,63.24 57.725,63.563 57.875,63.713 58.175,63.713 58.325,63.563 58.325,63.24 58.475,63.09 58.775,63.09 58.925,63.24 58.925,63.878 59.075,64.028 59.375,64.028 59.525,63.878 59.525,63.24 59.675,63.09 60.515,63.09 62.3,64.875 63.05,64.875 63.62,65.445 v1(64.7,65.445)
DDR4_SODIMM_A13: J8.158 J20.158 U1.AG7 | length 85.3
  1_Top w0.25: J20.158@18.4,88.475 v1(19.602,88.475) ; v1(29.25,88.475) J8.158@30.4,88.475 ; v1(68.694,69.439) U1.AG7@69.194,69.939
  10_int9_(sign) w0.15: v1(19.602,88.475) 20.4,88.475 20.725,88.15 26,88.15 26.325,88.475 v1(29.25,88.475)
  12_int11_(sign) w0.15: v1(29.25,88.475) 30.425,89.65 37.875,89.65 38.45,90.225 40.6,90.225 40.75,90.375 40.75,91.225 40.9,91.375 41.2,91.375 41.35,91.225 41.35,89.935 41.5,89.785 41.8,89.785 41.95,89.935 41.95,91.225 42.1,91.375 42.4,91.375 42.55,91.225 42.55,89.935 42.7,89.785 43,89.785 43.15,89.935 43.15,91.225 43.3,91.375 43.6,91.375 43.75,91.225 43.75,89.935 43.9,89.785 44.2,89.785 44.35,89.935 44.35,91.225 44.5,91.375 44.8,91.375 44.95,91.225 44.95,89.935 45.1,89.785 45.4,89.785 45.55,89.935 45.55,91.225 45.7,91.375 46,91.375 46.15,91.225 46.15,89.935 46.3,89.785 46.6,89.785 46.75,89.935 46.75,91.225 46.9,91.375 47.2,91.375 47.35,91.225 47.35,90.375 47.5,90.225 53.25,90.225 54.925,88.55 60.625,88.55 62.775,86.4 62.775,80.05 64.15,78.675 64.15,77.175 64.375,76.95 64.8,76.95 65.1,76.65 65.1,76.375 65.6,75.875 65.875,75.875 66.225,75.525 66.225,74.175 66.475,73.925 67,73.925 67.2,73.725 67.2,73.15 67.425,72.925 67.9,72.925 68.2,72.625 68.2,70.42 68.694,69.926 v1(68.694,69.439)
DDR4_SODIMM_A14: J8.151 J20.151 U1.AG4 | length 85.2
  1_Top w0.25: J20.151@26.6,86.725 v1(27.75,86.725) ; v1(37.398,86.725) J8.151@38.6,86.725 ; U1.AG4@66.194,69.939 66.65,69.483 v1(66.65,69.475)
  12_int11_(sign) w0.15: v1(27.75,86.725) 28.175,86.725 28.9,86 30.65,86 31.25,86.6 37.273,86.6 v1(37.398,86.725) 38.15,86.725 38.4,86.475 39.775,86.475 40.325,85.925 40.575,85.925 40.725,86.075 40.725,86.975 40.875,87.125 41.175,87.125 41.325,86.975 41.325,85.804 41.475,85.654 41.775,85.654 41.925,85.804 41.925,86.975 42.075,87.125 42.375,87.125 42.525,86.975 42.525,85.804 42.675,85.654 42.975,85.654 43.125,85.804 43.125,86.975 43.275,87.125 43.575,87.125 43.725,86.975 43.725,85.804 43.875,85.654 44.175,85.654 44.325,85.804 44.325,86.975 44.475,87.125 44.775,87.125 44.925,86.975 44.925,85.804 45.075,85.654 45.375,85.654 45.525,85.804 45.525,86.975 45.675,87.125 45.975,87.125 46.125,86.975 46.125,85.804 46.275,85.654 46.575,85.654 46.725,85.804 46.725,86.975 46.875,87.125 47.175,87.125 47.325,86.975 47.325,85.804 47.475,85.654 47.775,85.654 47.925,85.804 47.925,86.975 48.075,87.125 48.375,87.125 48.525,86.975 48.525,85.804 48.675,85.654 48.975,85.654 49.125,85.804 49.125,86.975 49.275,87.125 49.575,87.125 49.725,86.975 49.725,86.075 49.875,85.925 52.225,85.925 52.868,85.282 52.868,85.07 52.711,84.913 52.711,84.701 52.923,84.489 53.135,84.489 53.398,84.752 54.122,85.476 54.334,85.476 54.547,85.264 54.547,85.052 53.822,84.328 53.559,84.065 53.559,83.852 53.771,83.64 53.984,83.64 54.247,83.903 54.971,84.628 55.183,84.628 55.395,84.415 55.395,84.203 54.671,83.479 54.018,82.826 54.018,82.614 54.23,82.401 54.442,82.401 55.819,83.779 56.032,83.779 56.244,83.567 56.244,83.355 55.336,82.447 55.336,82.235 55.548,82.023 55.76,82.023 55.944,82.206 56.668,82.93 56.88,82.93 57.092,82.718 57.092,82.506 56.474,81.888 56.474,81.676 57.525,80.625 57.525,80.6 59.35,78.775 59.35,78.3 61.425,76.225 61.425,73.9 62.375,72.95 63.9,72.95 64.225,72.625 64.225,71.114 65.4,69.939 66.186,69.939 v1(66.65,69.475)
DDR4_SODIMM_A15: J8.156 J20.156 U1.AF5 | length 86.2
  1_Top w0.25: J20.156@18.4,87.975 v1(19.602,87.975) ; v1(29.25,87.975) J8.156@30.4,87.975 ; U1.AF5@67.194,70.939 67.675,70.458 v1(67.675,70.45)
  12_int11_(sign) w0.15: v1(19.602,87.975) 24.9,87.975 25.125,88.2 28.325,88.2 28.55,87.975 v1(29.25,87.975) 30.675,87.975 31.125,88.425 31.375,88.425 31.7,88.1 32.1,88.1 32.425,88.425 32.75,88.425 33,88.175 33.375,88.175 33.625,88.425 33.925,88.425 34.2,88.15 34.55,88.15 34.825,88.425 38.065,88.425 38.865,89.225 53.075,89.225 54.35,87.95 59.975,87.95 60.725,87.2 60.725,86.775 60.575,86.625 60.097,86.625 59.947,86.475 59.947,86.175 60.097,86.025 61.775,86.025 61.925,85.875 61.925,85.575 61.775,85.425 59.958,85.425 59.808,85.275 59.808,84.975 59.958,84.825 61.775,84.825 61.925,84.675 61.925,84.375 61.775,84.225 60.01,84.225 59.86,84.075 59.86,83.775 60.01,83.625 61.775,83.625 61.925,83.475 61.925,83.175 61.775,83.025 59.826,83.025 59.676,82.875 59.676,82.575 59.826,82.425 61.775,82.425 61.925,82.275 61.925,81.975 61.775,81.825 60.069,81.825 59.919,81.675 59.919,81.375 60.069,81.225 61.775,81.225 61.925,81.075 61.925,80.775 61.775,80.625 60.875,80.625 60.725,80.475 60.725,79.6 62.35,77.975 62.925,77.975 63.2,77.7 63.2,75.9 63.75,75.35 64.7,75.35 65.175,74.875 65.175,73.775 66.175,72.775 66.175,72.25 66.45,71.975 67.063,71.975 67.238,71.8 67.238,70.987 67.675,70.55 v1(67.675,70.45)
DDR4_SODIMM_A16: J8.152 J20.152 U1.AF4 | length 86.4
  1_Top w0.25: J20.152@18.4,86.975 v1(19.602,86.975) ; v1(29.251,86.979) 30.346,86.979 30.375,86.95 J8.152@30.4,86.975 ; U1.AF4@66.194,70.939 66.725,70.408 v1(66.725,70.4)
  12_int11_(sign) w0.15: v1(19.602,86.975) 22.375,86.975 22.575,86.775 25.8,86.775 26.25,87.225 28.525,87.225 28.771,86.979 v1(29.251,86.979) 31.879,86.979 32.135,87.235 38.534,87.235 39.324,88.025 40.275,88.025 40.425,88.175 40.425,88.565 40.575,88.715 40.875,88.715 41.025,88.565 41.025,87.785 41.175,87.635 41.475,87.635 41.625,87.785 41.625,88.565 41.775,88.715 42.075,88.715 42.225,88.565 42.225,87.785 42.375,87.635 42.675,87.635 42.825,87.785 42.825,88.565 42.975,88.715 43.275,88.715 43.425,88.565 43.425,87.785 43.575,87.635 43.875,87.635 44.025,87.785 44.025,88.565 44.175,88.715 44.475,88.715 44.625,88.565 44.625,87.785 44.775,87.635 45.075,87.635 45.225,87.785 45.225,88.565 45.375,88.715 45.675,88.715 45.825,88.565 45.825,87.785 45.975,87.635 46.275,87.635 46.425,87.785 46.425,88.565 46.575,88.715 46.875,88.715 47.025,88.565 47.025,87.785 47.175,87.635 47.475,87.635 47.625,87.785 47.625,88.565 47.775,88.715 48.075,88.715 48.225,88.565 48.225,87.785 48.375,87.635 48.675,87.635 48.825,87.785 48.825,88.565 48.975,88.715 49.275,88.715 49.425,88.565 49.425,87.785 49.575,87.635 49.875,87.635 50.025,87.785 50.025,88.565 50.175,88.715 50.475,88.715 50.625,88.565 50.625,86.975 50.775,86.825 51.075,86.825 51.225,86.975 51.225,88.565 51.375,88.715 51.675,88.715 51.825,88.565 51.825,88.175 51.975,88.025 52.65,88.025 52.969,87.706 53.181,87.706 53.348,87.874 53.56,87.874 53.772,87.661 53.772,87.449 52.829,86.506 52.829,86.294 53.041,86.082 53.253,86.082 54.539,87.367 54.751,87.367 54.963,87.155 54.963,86.943 54.347,86.328 54.347,86.169 54.613,85.903 54.772,85.903 55.441,86.573 55.654,86.573 55.866,86.361 55.866,86.149 55.302,85.585 55.302,85.373 59.425,81.25 59.425,79.45 62.2,76.675 62.2,75.85 63.05,75 63.05,74.425 63.525,73.95 64.1,73.95 65.225,72.825 65.225,71.9 v1(66.725,70.4)
DDR4_SODIMM_ACT: J8.114 J20.114 U1.AV9 | length 84.7
  1_Top w0.25: J20.114@18.4,75.475 v1(19.602,75.475) ; v1(29.25,75.475) J8.114@30.4,75.475 ; v1(70.694,58.439) U1.AV9@71.194,58.939
  10_int9_(sign) w0.15: v1(19.602,75.475) 20.275,75.475 21.5,74.25 25.95,74.25 26.425,74.725 28.025,74.725 28.775,75.475 v1(29.25,75.475) 33.15,75.475 37.2,71.425 37.2,71.025 38.525,69.7 40.158,69.7 41.865,67.993 41.865,61.01 42.36,60.515 42.565,60.515 42.777,60.515 42.989,60.303 42.989,60.091 42.02,59.122 42.02,58.91 42.232,58.698 42.444,58.698 43.413,59.667 43.625,59.667 43.837,59.455 43.837,59.242 43.735,59.14 42.869,58.274 42.869,58.062 43.081,57.85 43.293,57.85 44.159,58.716 44.262,58.818 44.474,58.818 44.686,58.606 44.686,58.394 44.583,58.292 43.717,57.425 43.717,57.213 43.929,57.001 44.141,57.001 45.11,57.97 45.322,57.97 45.534,57.758 45.534,57.545 45.432,57.443 44.566,56.577 44.566,56.365 44.778,56.153 44.99,56.153 45.856,57.019 45.959,57.121 46.171,57.121 46.383,56.909 46.383,56.697 46.28,56.595 45.44,55.754 45.44,55.542 45.652,55.33 45.864,55.33 46.672,56.138 46.737,56.138 47.545,55.33 64.475,55.33 64.625,55.48 64.625,55.725 64.825,55.925 65.08,55.925 65.225,55.78 65.225,55.48 65.375,55.33 67.585,55.33 v1(70.694,58.439)
DDR4_SODIMM_ALERT: J8.116 J20.116 U1.AU9 | length 84.1
  1_Top w0.25: J20.116@18.4,75.975 v1(19.602,75.975) ; v1(29.251,75.979) 30.346,75.979 30.375,75.95 J8.116@30.4,75.975 ; v1(70.68,59.425) U1.AU9@71.194,59.939
  10_int9_(sign) w0.15: v1(19.602,75.975) 20.7,75.975 21.075,75.6 25.925,75.6 26.55,76.225 28.575,76.225 28.821,75.979 v1(29.251,75.979) 33.621,75.979 38.75,70.85 39.729,70.85 42.375,68.204 42.375,63.483 42.885,62.973 43.097,62.973 43.309,62.973 43.521,62.761 43.521,62.548 42.585,61.613 42.585,61.4 42.798,61.188 43.01,61.188 43.917,62.096 44.129,62.096 44.341,61.883 44.341,61.671 44.264,61.594 43.434,60.764 43.434,60.552 43.646,60.34 43.858,60.34 44.688,61.17 44.765,61.247 44.977,61.247 45.19,61.035 45.19,60.823 45.112,60.745 44.282,59.916 44.282,59.703 44.495,59.491 44.707,59.491 45.614,60.398 45.826,60.398 46.038,60.186 46.038,59.974 45.961,59.897 45.131,59.067 45.131,58.855 45.343,58.643 45.555,58.643 46.385,59.473 46.462,59.55 46.675,59.55 46.887,59.338 46.887,59.126 46.809,59.048 45.979,58.218 45.979,58.006 46.192,57.794 46.404,57.794 47.311,58.701 47.523,58.701 47.735,58.489 47.735,58.277 47.658,58.2 46.828,57.37 46.828,57.158 47.04,56.946 47.252,56.946 47.976,57.669 48.188,57.669 50.018,55.84 63.415,55.84 65.5,57.925 68.925,57.925 70.425,59.425 v1(70.68,59.425)
DDR4_SODIMM_BA0: J8.150 J20.150 U1.AK11 | length 90.4
  1_Top w0.25: J20.150@18.4,86.475 v1(19.602,86.475) ; v1(29.25,86.475) J8.150@30.4,86.475 ; v1(72.65,66.4) 72.655,66.4 U1.AK11@73.194,66.939
  10_int9_(sign) w0.15: v1(19.602,86.475) 25.625,86.475 26.425,87.275 28.175,87.275 28.975,86.475 v1(29.25,86.475) 36.175,86.475 36.935,85.715 38.86,85.715 39.225,85.35 40.339,85.35 42.519,87.531 42.519,88.519 42.9,88.9 43.4,88.9 43.55,89.05 43.55,90.106 43.7,90.256 44,90.256 44.15,90.106 44.15,88.816 44.3,88.666 44.6,88.666 44.75,88.816 44.75,90.106 44.9,90.256 45.2,90.256 45.35,90.106 45.35,88.826 45.5,88.676 45.8,88.676 45.95,88.826 45.95,90.106 46.1,90.256 46.4,90.256 46.55,90.106 46.55,88.826 46.7,88.676 47,88.676 47.15,88.826 47.15,90.106 47.3,90.256 47.6,90.256 47.75,90.106 47.75,88.826 47.9,88.676 48.2,88.676 48.35,88.826 48.35,90.106 48.5,90.256 48.8,90.256 48.95,90.106 48.95,88.826 49.1,88.676 49.4,88.676 49.55,88.826 49.55,90.106 49.7,90.256 50,90.256 50.15,90.106 50.15,88.826 50.3,88.676 50.6,88.676 50.75,88.826 50.75,88.808 50.843,88.9 55.15,88.9 55.79,88.26 56.062,88.26 57.265,87.057 57.265,85.791 57.952,85.104 58.071,85.104 59.3,83.875 61.304,83.875 62.264,82.915 62.749,82.915 65.075,80.589 65.075,80.47 69.595,75.95 69.859,75.95 70.1,75.709 70.1,75.564 71.319,74.345 71.319,74.284 71.539,74.064 71.736,74.064 72.325,73.475 72.325,72.58 72.304,72.559 72.304,72.248 72.325,72.227 72.325,70.655 72.304,70.634 72.304,70.323 72.325,70.302 72.325,67.32 72.65,66.995 v1(72.65,66.4)
DDR4_SODIMM_BA1: J8.145 J20.145 U1.AL10 | length 90.3
  1_Top w0.25: J20.145@26.6,85.225 v1(27.75,85.225) ; v1(37.398,85.225) J8.145@38.6,85.225 ; U1.AL10@72.194,65.939 72.292,65.842 72.262,65.812 72.625,65.45 v1(72.625,65.425)
  5_int4_(sign) w0.15: v1(72.625,65.425) 72.7,65.425 v1@72.75,65.375
  7_int6_(sign) w0.15: v1(27.75,85.225) 27.95,85.025 34.225,85.025 34.375,84.875 34.375,84.749 34.525,84.599 34.825,84.599 34.975,84.749 34.975,85.251 35.125,85.401 35.425,85.401 35.575,85.251 35.575,84.749 35.725,84.599 36.025,84.599 36.175,84.749 36.175,84.875 36.325,85.025 36.475,85.025 36.5,85.05 37.223,85.05 v1(37.398,85.225)
  10_int9_(sign) w0.15: v1(37.398,85.225) 38.35,85.225 38.85,84.725 40.435,84.725 42.535,86.825 43.6,86.825 43.75,86.975 43.75,87.997 43.9,88.147 44.2,88.147 44.35,87.997 44.35,86.825 44.49,86.685 44.81,86.685 44.95,86.825 44.95,88.007 45.1,88.157 45.4,88.157 45.55,88.007 45.55,86.825 45.69,86.685 46.01,86.685 46.15,86.825 46.15,88.007 46.3,88.157 46.6,88.157 46.75,88.007 46.75,86.825 46.89,86.685 47.21,86.685 47.35,86.825 47.35,88.007 47.5,88.157 47.8,88.157 47.95,88.007 47.95,86.825 48.09,86.685 48.41,86.685 48.55,86.825 48.55,88.007 48.7,88.157 49,88.157 49.15,88.007 49.15,86.825 49.29,86.685 49.61,86.685 49.75,86.825 49.75,88.007 49.9,88.157 50.2,88.157 50.35,88.007 50.35,86.825 50.49,86.685 50.81,86.685 50.95,86.825 50.95,88.007 51.1,88.157 51.4,88.157 51.55,88.007 51.55,86.825 51.69,86.685 52.01,86.685 52.15,86.825 52.15,88.007 52.3,88.157 52.6,88.157 52.75,88.007 52.75,86.825 52.89,86.685 53.21,86.685 53.35,86.825 53.35,88.007 53.5,88.157 53.8,88.157 53.95,88.007 53.95,86.825 54.09,86.685 54.41,86.685 54.55,86.825 54.55,88.007 54.7,88.157 55,88.157 55.15,88.007 55.15,86.975 55.3,86.825 56.35,86.825 56.725,86.45 56.725,85.174 58.074,83.825 58.376,83.825 58.625,83.576 58.625,83.574 59.349,82.85 61.753,82.85 68.753,75.85 68.83,75.85 69.1,75.58 69.1,75.503 69.699,74.904 69.727,74.904 70.05,74.58 70.05,74.148 72.069,72.129 72.069,70.753 72.054,70.737 72.054,70.22 72.069,70.204 72.069,66.657 72.1,66.626 72.1,65.95 v1(72.625,65.425)
DDR4_SODIMM_BG0: J8.115 J20.115 U1.AN9 | length 88.6
  1_Top w0.25: J20.115@26.6,75.725 v1(27.75,75.725) ; v1(37.398,75.725) J8.115@38.6,75.725 ; v1(70.675,63.4) 70.675,63.42 U1.AN9@71.194,63.939
  7_int6_(sign) w0.15: v1(27.75,75.725) 28,75.725 29.025,74.7 30.35,74.7 31.025,75.375 31.15,75.375 31.275,75.5 31.975,75.5 32.1,75.375 32.875,75.375 33.25,75 33.9,75 34.275,75.375 34.65,75.375 35.175,74.85 35.825,74.85 36.1,75.125 36.1,75.375 36.3,75.375 36.65,75.725 v1(37.398,75.725)
  10_int9_(sign) w0.15: v1(37.398,75.725) 37.975,75.725 39.525,74.175 39.83,74.175 41.345,72.66 41.345,71.555 51.8,61.1 51.8,60.45 51.95,60.3 52.125,60.3 52.35,60.525 52.35,61.44 52.5,61.59 52.8,61.59 52.95,61.44 52.95,59.31 53.1,59.16 53.4,59.16 53.55,59.31 53.55,61.44 53.7,61.59 54,61.59 54.15,61.44 54.15,59.31 54.3,59.16 54.6,59.16 54.75,59.31 54.75,60.922 54.9,61.072 55.2,61.072 55.35,60.922 55.35,59.31 55.5,59.16 55.8,59.16 55.95,59.31 55.95,61.44 56.1,61.59 56.4,61.59 56.55,61.44 56.55,59.31 56.7,59.16 57,59.16 57.15,59.31 57.15,61.44 57.3,61.59 57.6,61.59 57.75,61.44 57.75,59.31 57.9,59.16 58.2,59.16 58.35,59.31 58.35,60.928 58.5,61.078 58.8,61.078 58.95,60.928 58.95,59.31 59.1,59.16 59.4,59.16 59.55,59.31 59.55,61.44 59.7,61.59 60,61.59 60.15,61.44 60.15,59.31 60.3,59.16 60.6,59.16 60.75,59.31 60.75,61.44 60.9,61.59 61.2,61.59 61.35,61.44 61.35,60.525 61.5,60.375 61.65,60.375 62.05,59.975 64.76,59.975 65.069,60.284 65.069,60.369 65.625,60.925 67.4,60.925 69.35,62.875 70.15,62.875 v1(70.675,63.4)
DDR4_SODIMM_BG1: J8.113 J20.113 U1.AP8 | length 87.5
  1_Top w0.25: J20.113@26.6,75.225 v1(27.75,75.225) ; v1(37.398,75.225) J8.113@38.6,75.225 ; U1.AP8@70.194,62.939 70.675,62.458 v1(70.675,62.425)
  7_int6_(sign) w0.15: v1(27.75,75.225) 28.05,74.925 28.05,74.475 29.1,73.425 29.975,73.425 30.575,74.025 34.925,74.025 35.1,73.85 35.4,73.85 35.575,74.025 36.225,74.025 37.398,75.198 v1(37.398,75.225)
  10_int9_(sign) w0.15: v1(37.398,75.225) 38.075,74.548 38.075,73.85 38.725,73.2 39.805,73.2 40.8,72.205 40.8,71.331 44.166,67.966 44.166,67.791 44.691,67.266 44.865,67.266 45.183,66.948 45.183,66.736 44.423,65.976 44.423,65.763 44.635,65.551 44.848,65.551 45.608,66.311 45.82,66.311 46.032,66.099 46.032,65.887 45.272,65.127 45.272,64.915 45.484,64.703 45.696,64.703 46.456,65.463 46.668,65.463 46.881,65.251 46.881,65.039 46.12,64.278 46.12,64.066 46.332,63.854 46.545,63.854 47.305,64.614 47.517,64.614 47.729,64.402 47.729,64.19 46.969,63.43 46.969,63.218 47.181,63.006 47.393,63.006 48.153,63.766 48.365,63.766 48.578,63.554 48.578,63.342 47.817,62.581 47.817,62.369 48.03,62.157 48.242,62.157 49.002,62.917 49.214,62.917 49.426,62.705 49.426,62.493 48.666,61.733 48.666,61.521 48.878,61.309 49.09,61.309 49.85,62.069 50.062,62.069 51.075,61.056 51.075,58.9 51.5,58.475 52.025,58.475 52.175,58.625 52.175,58.763 52.325,58.913 52.625,58.913 52.775,58.763 52.775,57.25 52.925,57.1 53.225,57.1 53.375,57.25 53.375,58.515 53.525,58.665 53.825,58.665 53.975,58.515 53.975,57.25 54.125,57.1 54.425,57.1 54.575,57.25 54.575,58.515 54.725,58.665 55.025,58.665 55.175,58.515 55.175,57.25 55.325,57.1 55.625,57.1 55.775,57.25 55.775,58.515 55.925,58.665 56.225,58.665 56.375,58.515 56.375,57.25 56.525,57.1 56.825,57.1 56.975,57.25 56.975,58.515 57.125,58.665 57.425,58.665 57.575,58.515 57.575,57.25 57.725,57.1 58.025,57.1 58.175,57.25 58.175,58.325 58.325,58.475 61.892,58.475 62.482,59.064 63.849,59.064 63.86,59.075 64.755,59.075 64.975,59.295 64.975,59.375 65.65,60.05 67.83,60.05 68.05,60.27 68.05,60.35 68.725,61.025 68.855,61.025 69.83,62 70.25,62 v1(70.675,62.425)
DDR4_SODIMM_CK0_N: J8.139 R239.2 U1.AE8 | length 77.9
  1_Top w0.15: J8.139@38.6,81.725 v1(39.75,81.725) ; v1(69.694,71.439) U1.AE8@70.194,71.939
  10_int9_(sign) w0.13: v1(39.75,81.725) 39.85,81.625 47.449,81.625 48.174,80.901 48.368,80.901 48.767,81.3 49.599,82.132 49.901,82.132 50.006,82.027 50.037,82.027 50.315,81.749 50.315,81.335 50.298,81.318 49.69,80.71 48.265,79.285 48.265,79.091 48.488,78.867 48.682,78.867 49.975,80.16 50.88,81.065 51.349,81.065 51.675,80.739 51.675,80.347 51.645,80.317 49.439,78.111 49.439,77.917 49.662,77.694 49.856,77.694 51.112,78.95 52.102,79.94 52.474,79.94 52.825,79.589 52.825,79.175 52.01,78.36 52.01,78.334 51.983,78.308 50.613,76.937 50.613,76.743 50.836,76.52 51.03,76.52 52.285,77.775 53.35,78.84 53.799,78.84 54.12,78.52 54.12,78.097 53.212,77.189 51.786,75.763 51.786,75.569 52.01,75.346 52.204,75.346 54.058,77.2 54.475,77.2 54.8,76.875 54.8,76.429 54.201,75.83 52.96,74.589 52.96,74.395 53.183,74.172 53.377,74.172 54.803,75.598 55.196,75.598 55.559,75.234 55.559,74.841 54.134,73.416 54.134,73.222 54.357,72.998 54.551,72.998 55.977,74.424 56.37,74.424 56.733,74.06 56.733,73.667 55.308,72.242 55.308,72.048 55.531,71.825 55.725,71.825 56.291,72.391 56.684,72.391 57.509,71.565 61.549,71.565 62.054,71.06 65.46,71.06 65.625,71.225 65.875,71.225 66.04,71.06 68.335,71.06 68.5,71.225 68.7,71.225 68.865,71.06 69.315,71.06 v1(69.694,71.439)
  16_Bottom w0.15: R239.2@39.1,81.925 39.55,81.925 v1(39.75,81.725)
DDR4_SODIMM_CK0_P: J8.137 R239.1 U1.AF8 | length 77.7
  1_Top w0.15: J8.137@38.6,81.225 39.731,81.225 v1(39.752,81.204) ; v1(69.694,70.439) U1.AF8@70.194,70.939
  10_int9_(sign) w0.13: v1(39.752,81.204) 39.898,81.35 39.905,81.35 39.94,81.385 47.35,81.385 48.074,80.661 48.467,80.661 48.937,81.13 49.699,81.892 49.802,81.892 49.907,81.787 49.938,81.787 50.075,81.65 50.075,81.434 48.025,79.384 48.025,78.991 48.389,78.627 48.782,78.627 50.145,79.991 50.979,80.825 51.25,80.825 51.435,80.64 51.435,80.446 49.199,78.21 49.199,77.817 49.562,77.454 49.955,77.454 51.282,78.78 52.202,79.7 52.375,79.7 52.585,79.49 52.585,79.274 51.743,78.433 51.743,78.407 50.373,77.036 50.373,76.643 50.736,76.28 51.129,76.28 52.455,77.605 53.449,78.6 53.7,78.6 53.88,78.42 53.88,78.196 52.972,77.288 51.546,75.863 51.546,75.47 51.91,75.106 52.303,75.106 53.673,76.477 54.157,76.96 54.376,76.96 54.56,76.776 54.56,76.529 54.031,76 52.72,74.689 52.72,74.296 53.084,73.932 53.477,73.932 54.902,75.358 55.096,75.358 55.319,75.135 55.319,74.94 53.894,73.515 53.894,73.122 54.258,72.758 54.651,72.758 56.076,74.184 56.27,74.184 56.493,73.961 56.493,73.767 55.068,72.341 55.068,71.948 55.431,71.585 55.824,71.585 56.39,72.151 56.584,72.151 57.4,71.335 57.951,71.335 57.961,71.325 61.45,71.325 61.955,70.82 69.313,70.82 v1(69.694,70.439)
  16_Bottom w0.15: R239.1@39.1,81.075 39.104,81.079 39.627,81.079 v1(39.752,81.204)
DDR4_SODIMM_CK1_N: J8.140 R238.2 U1.AH3 | length 74.4
  1_Top w0.15: v1(29.25,82) 30.375,82 J8.140@30.4,81.975 ; v1(64.694,68.439) U1.AH3@65.194,68.939
  10_int9_(sign) w0.13: v1(29.25,82) 29.392,81.858 36.657,81.858 37.589,80.925 38.674,80.925 39.434,80.165 45.599,80.165 46.826,78.938 46.826,78.546 45.642,77.361 45.642,77.167 45.865,76.944 46.059,76.944 47.243,78.128 47.636,78.128 48,77.765 48,77.372 46.815,76.187 46.815,75.993 47.039,75.77 47.233,75.77 48.417,76.955 48.81,76.955 49.174,76.591 49.174,76.198 47.989,75.014 47.989,74.82 48.212,74.596 48.406,74.596 49.591,75.781 49.984,75.781 50.347,75.417 50.347,75.024 49.163,73.84 49.163,73.646 49.386,73.423 49.58,73.423 50.765,74.607 51.157,74.607 51.521,74.243 51.521,73.85 50.337,72.666 50.337,72.472 50.56,72.249 50.754,72.249 51.938,73.433 52.331,73.433 52.695,73.069 52.695,72.677 51.511,71.492 51.511,71.298 51.734,71.075 51.928,71.075 53.112,72.259 53.505,72.259 53.869,71.896 53.869,71.503 52.684,70.318 52.684,70.124 52.908,69.901 53.102,69.901 54.286,71.086 54.679,71.086 55.043,70.722 55.043,70.329 53.858,69.145 53.858,68.951 54.081,68.727 54.275,68.727 55.46,69.912 55.853,69.912 56.574,69.19 59.86,69.19 60.601,68.449 60.834,68.449 61.035,68.65 61.035,68.76 61.4,69.125 61.85,69.125 62.125,68.85 62.125,68.49 62.55,68.065 63.519,68.065 63.524,68.06 63.826,68.06 63.831,68.065 64.4,68.065 64.694,68.359 v1(64.694,68.439)
  16_Bottom w0.15: v1(29.25,82) 29.726,82 R238.2@29.901,82.175
DDR4_SODIMM_CK1_P: J8.138 R238.1 U1.AJ3 | length 74.5
  1_Top w0.15: v1(29.25,81.475) J8.138@30.4,81.475 ; v1(64.694,67.439) U1.AJ3@65.194,67.939
  10_int9_(sign) w0.13: v1(29.25,81.475) 29.393,81.618 36.558,81.618 37.49,80.685 38.575,80.685 39.335,79.925 45.5,79.925 46.586,78.839 46.586,78.645 45.402,77.461 45.402,77.068 45.765,76.704 46.158,76.704 47.343,77.888 47.537,77.888 47.76,77.665 47.76,77.471 46.575,76.287 46.575,75.894 46.939,75.53 47.332,75.53 48.516,76.715 48.71,76.715 48.934,76.491 48.934,76.297 47.749,75.113 47.749,74.72 48.113,74.356 48.506,74.356 49.69,75.541 49.884,75.541 50.107,75.318 50.107,75.124 48.923,73.939 48.923,73.546 49.287,73.183 49.68,73.183 50.864,74.367 51.058,74.367 51.281,74.144 51.281,73.95 50.097,72.765 50.097,72.373 50.461,72.009 50.853,72.009 52.038,73.193 52.232,73.193 52.455,72.97 52.455,72.776 51.271,71.592 51.271,71.199 51.634,70.835 52.027,70.835 53.212,72.019 53.406,72.019 53.629,71.796 53.629,71.602 52.444,70.418 52.444,70.025 52.808,69.661 53.201,69.661 54.385,70.846 54.579,70.846 54.803,70.622 54.803,70.428 53.618,69.244 53.618,68.851 53.982,68.487 54.375,68.487 55.559,69.672 55.753,69.672 56.475,68.95 56.502,68.923 56.647,68.923 56.674,68.95 59.761,68.95 60.501,68.209 60.934,68.209 61.275,68.551 61.275,68.661 61.499,68.885 61.751,68.885 61.885,68.751 61.885,68.391 62.075,68.201 62.451,67.825 62.85,67.825 62.975,67.7 63.425,67.7 63.545,67.82 63.926,67.82 63.931,67.825 64.4,67.825 64.694,67.531 v1(64.694,67.439)
  16_Bottom w0.15: v1(29.25,81.475) 29.751,81.475 R238.1@29.901,81.325